# Altium PCB BOARD_4LAYER.PcbDoc (part 10 of 21)
Units mil, origin at the board's own origin, x right, y up, seen from the top; angles counter-clockwise.
Board outline 6692.91 x 10039.37 mil, 4 copper layers (Top Layer, Mid Layer 1, Mid Layer 2, Bottom Layer), stack 66.299 mil thick; 1532 components, 908 nets, 4105 pads, 1286 vias.
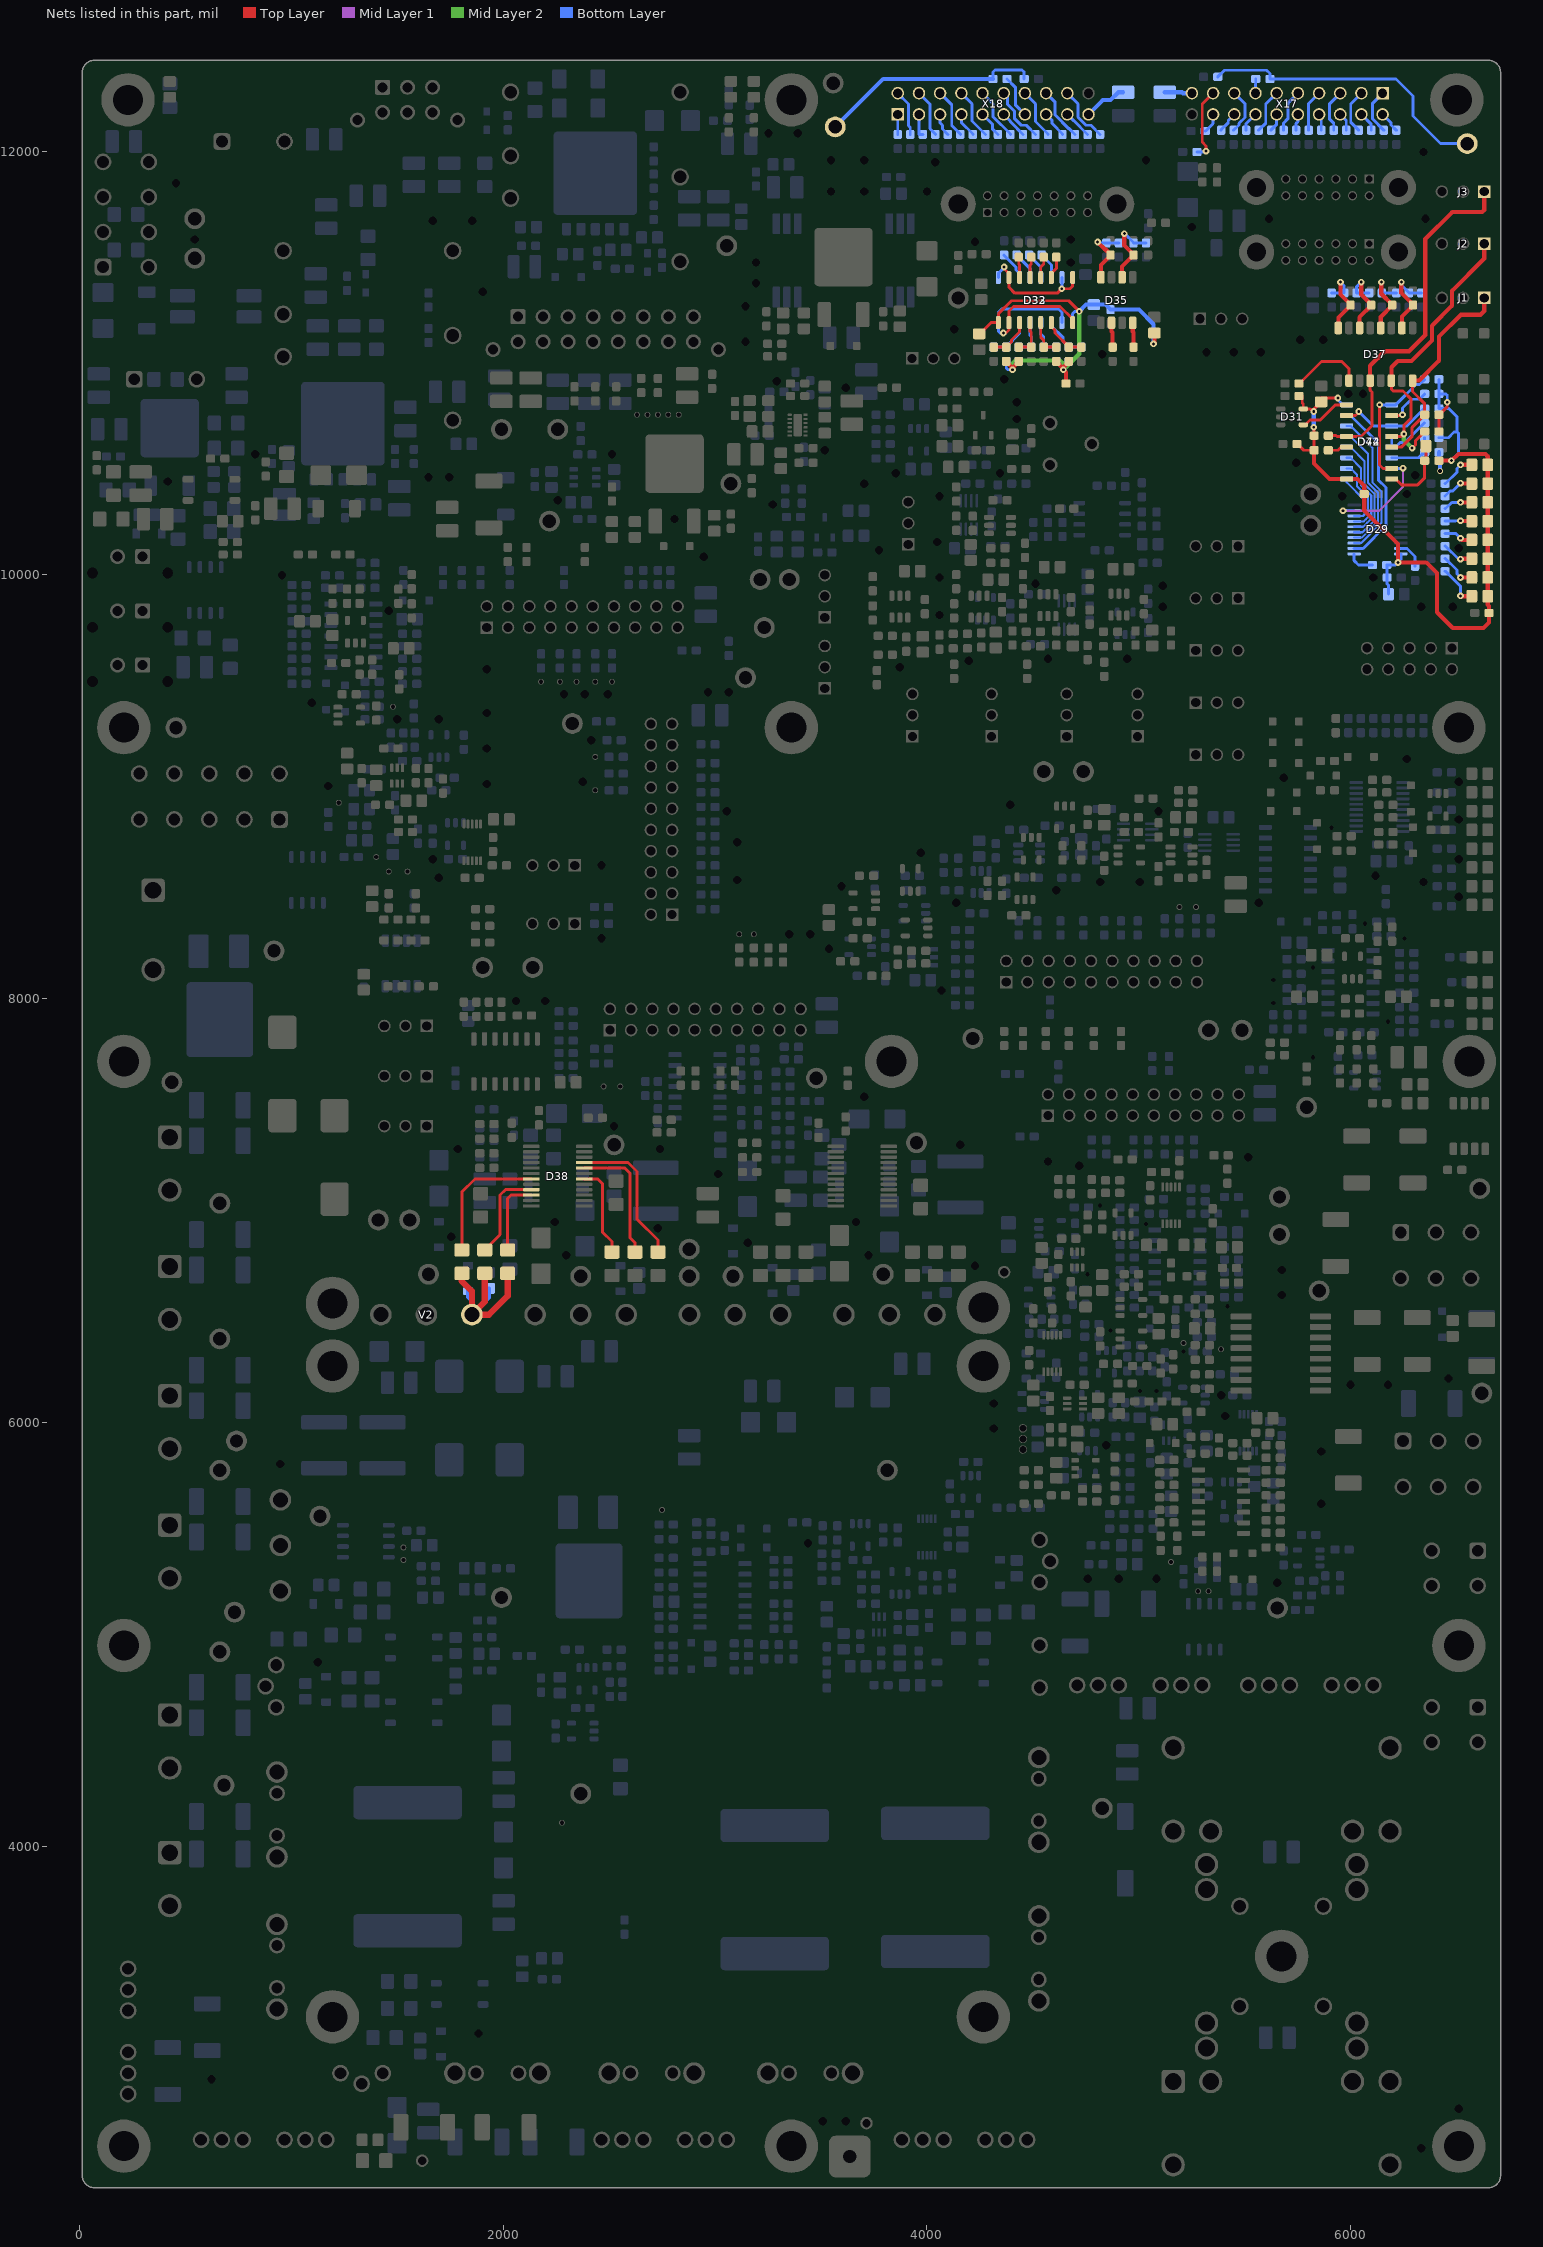
[diagram p12: the nets of this part, all layers, seen from the top]

## Components (designator, comment, footprint, x,y, rotation, side; value= is the part's Value field where it differs from the comment) (continued)
X28 "SBH11-PBPC-D05-ST-BK" IDS-10-V-2,54 6476.77,9655.12 r180 top
X29 "0430451612" 2Rx16K_VERT_Micro 2484.25,11159.45 r180 top locked
X30 "0430450612" 2Rx6K_VERT_Micro 1549.21,12242.13 r180 top

## Footprints (in the part's own frame and the unit in brackets; to place one, negate y for a bottom-side part, rotate by r counter-clockwise, add the part's x,y. Pads: shape width x height; smd on the part's side, far side on the other; paste and mask are expansions set on the pad)
1Rx2K_VERT_Micro [mm]
  rrect22% 1.8x1.8 / inner rrect21% 1.9x1.9 / far side rrect21% 1.8x1.8 hole 1.2 paste-2539.97 mask+0.1: 1(1.5,0)
  round 1.8 / inner round 1.9 / far side round 1.8 hole 1.2 paste-2539.97 mask+0.1: 2(-1.5,0)
  round 0 hole 1.3 unplated paste-2539.97 mask+0: ""(-4.5,-1.96) ""(4.5,-1.96)
  silkscreen extent -4.85,-2.2 4.85,3.7, body extent -4.85,-2.2 4.85,2.2, height 0.03
2-SMD_J-Lead [mm]
  rrect19% 3.2x2 smd paste-0.05 mask+0.1: 1(-4,0) 2(4,0)
  silkscreen extent -4.5,-1.6 4.5,1.6, body extent -4.5,-1.6 4.5,1.6, height 0.03
2Rx4K [mm]
  rrect39% 2x2 hole 1.4 paste-2539.97 mask+0.1: 1(-2.1,2.75)
  round 2 hole 1.4 paste-2539.97 mask+0.1: 2(2.1,2.75) 3(-2.1,-2.75) 4(2.1,-2.75)
  silkscreen extent -5,-6.25 5,4.9, body extent -5,-4.9 5,4.9, height 0.03
2Rx6K [mm]
  rrect39% 2x2 hole 1.4 paste-2539.97 mask+0.1: 1(-4.2,2.75)
  round 2 hole 1.4 paste-2539.97 mask+0.1: 2(0,2.75) 3(4.2,2.75) 4(-4.2,-2.75) 5(0,-2.75) 6(4.2,-2.75)
  silkscreen extent -7.1,-6.25 7.1,4.9, body extent -7.1,-4.9 7.1,4.9, height 0.03
2Rx6K_VERT_Micro [mm]
  rrect22% 1.8x1.8 / inner rrect21% 1.9x1.9 / far side rrect21% 1.8x1.8 hole 1.2 paste-2539.97 mask+0.1: 1(3,-1.5)
  round 1.8 / inner round 1.9 / far side round 1.8 hole 1.2 paste-2539.97 mask+0.1: 2(0,-1.5) 3(-3,-1.5) 4(3,1.5) 5(0,1.5) 6(-3,1.5)
  round 1.8 hole 1.2 paste-2539.97 mask+0.1: ""(-6,2.44) ""(6,2.44)
  silkscreen extent -6.35,-3.7 6.35,5.2, body extent -6.35,-3.7 6.35,3.7, height 0.03
2Rx8K [mm]
  rrect39% 2x2 hole 1.4 paste-2539.97 mask+0.1: 1(-6.3,2.75)
  round 2 hole 1.4 paste-2539.97 mask+0.1: 2(-2.1,2.75) 3(2.1,2.75) 4(6.3,2.75) 5(-6.3,-2.75) 6(-2.1,-2.75) 7(2.1,-2.75) 8(6.3,-2.75)
  silkscreen extent -9.2,-6.25 9.2,4.9, body extent -9.2,-4.9 9.2,4.9, height 0.03
2Rx10K [mm]
  rrect39% 2x2 hole 1.4 paste-2539.97 mask+0.1: 1(-8.4,2.75)
  round 2 hole 1.4 paste-2539.97 mask+0.1: 2(-4.2,2.75) 3(0,2.75) 4(4.2,2.75) 5(8.4,2.75) 6(-8.4,-2.75) 7(-4.2,-2.75) 8(0,-2.75) 9(4.2,-2.75) 10(8.4,-2.75)
  silkscreen extent -11.3,-6.25 11.3,4.9, body extent -11.3,-4.9 11.3,4.9, height 0.03
2Rx16K_VERT_Micro [mm]
  rrect22% 1.8x1.8 / inner rrect21% 1.9x1.9 / far side rrect21% 1.8x1.8 hole 1.2 paste-2539.97 mask+0.1: 1(10.5,-1.5)
  round 1.8 / inner round 1.9 / far side round 1.8 hole 1.2 paste-2539.97 mask+0.1: 2(7.5,-1.5) 3(4.5,-1.5) 4(1.5,-1.5) 5(-1.5,-1.5) 6(-4.5,-1.5) 7(-7.5,-1.5) 8(-10.5,-1.5) 9(10.5,1.5) 10(7.5,1.5) 11(4.5,1.5) 12(1.5,1.5) 13(-1.5,1.5) 14(-4.5,1.5) 15(-7.5,1.5) 16(-10.5,1.5)
  round 1.8 hole 1.2 paste-2539.97 mask+0.1: ""(-13.5,2.44) ""(13.5,2.44)
  silkscreen extent -13.85,-3.7 13.85,5.2, body extent -13.85,-3.7 13.85,3.7, height 0.03
3-1437664-0 [mm]
  rrect28% 2.8x2.8 / inner rrect25% 3.1x3.1 / far side rrect25% 2.8x2.8 hole 2 paste-2539.97 mask+0.15: 1(-4.755,0)
  round 2.8 / inner round 3.1 / far side round 2.8 hole 2 paste-2539.97 mask+0.15: 2(4.755,0)
  silkscreen extent -10.5,-8 10.5,8, body extent -10.5,-8 10.5,8, height 0.03
8-SOIC-VISHAY [mm]
  rrect44% 0.9x1.5 smd paste-0.05 mask+0.1: 1(-1.905,-2.73) 2(-0.635,-2.73) 3(0.635,-2.73) 4(1.905,-2.73) 5(1.905,2.73) 6(0.635,2.73) 7(-0.635,2.73) 8(-1.905,2.73)
  silkscreen extent -3.76,-3.46 3.1,2.1, body extent -3.1,-2.1 3.1,2.1, height 0.03
"12-WFDFN_3mmx2mm_Exposed Pad" [mm]
  rrect40% 0.25x0.5 smd paste-0.025 mask+0.05: 1(-1.25,-0.95) 2(-0.75,-0.95) 3(-0.25,-0.95) 4(0.25,-0.95) 5(0.75,-0.95) 6(1.25,-0.95) 7(1.25,0.95) 8(0.75,0.95) 9(0.25,0.95) 10(-0.25,0.95) 11(-0.75,0.95) 12(-1.25,0.95)
  rrect20% 2.65x1 smd paste-0.05 mask+0.05: 13(0,0)
  silkscreen extent -1.75,-1.45 1.55,1.05, body extent -1.55,-1.05 1.55,1.05, height 0.03
14_h12_7_2K-PICH6_35 [mm]
  rrect28% 2.8x2.8 / inner rrect25% 3.1x3.1 / far side rrect25% 2.8x2.8 hole 2 paste-2539.97 mask+0.15: 1(-3.175,0)
  round 2.8 / inner round 3.1 / far side round 2.8 hole 2 paste-2539.97 mask+0.15: 2(3.175,0)
  silkscreen extent -7.25,-10.2 7.25,3.8, body extent -7.25,-10.2 7.25,3.8, height 0.03
16-SOIC-7mm5W-Allegro [mm]
  rrect28% 0.7x2.5 smd paste-0.05 mask+0.1: 1(-4.445,-4.75) 2(-3.175,-4.75) 3(-1.905,-4.75) 4(-0.635,-4.75) 5(0.635,-4.75) 6(1.905,-4.75) 7(3.175,-4.75) 8(4.445,-4.75) 9(4.445,4.75) 10(3.175,4.75) 11(1.905,4.75) 12(0.635,4.75) 13(-0.635,4.75) 14(-1.905,4.75) 15(-3.175,4.75) 16(-4.445,4.75)
  silkscreen extent -5.61,-7.31 5.25,3.8, body extent -5.25,-3.8 5.25,3.8, height 0.03
16-SOIC-VISHAY [mm]
  rrect44% 0.9x1.5 smd paste-0.05 mask+0.1: 1(-4.445,-3.15) 2(-3.175,-3.15) 3(-1.905,-3.15) 4(-0.635,-3.15) 5(0.635,-3.15) 6(1.905,-3.15) 7(3.175,-3.15) 8(4.445,-3.15) 9(4.445,3.15) 10(3.175,3.15) 11(1.905,3.15) 12(0.635,3.15) 13(-0.635,3.15) 14(-1.905,3.15) 15(-3.175,3.15) 16(-4.445,3.15)
  silkscreen extent -6.25,-3.75 5.2,2.3, body extent -5.2,-2.3 5.2,2.3, height 0.03
0603-STANDART-1608 [mm]
  rrect40% 1.1x1 smd paste-0.05 mask+0.1: 1(-0.85,0) 2(0.85,0)
  silkscreen extent -0.85,-0.47 0.85,0.48, body extent -0.85,-0.47 0.85,0.48, height 0.03
0805-STANDART-2012 [mm]
  rrect30% 1.3x1.5 smd paste-0.05 mask+0.1: 1(-0.95,0) 2(0.95,0)
  silkscreen extent -1.08,-0.7 1.07,0.7, body extent -1.08,-0.7 1.07,0.7, height 0.03
0805-STANDART-2012-SVET [mm]
  rrect30% 1.3x1.5 smd paste-0.05 mask+0.1: 1(-0.95,0) 2(0.95,0)
  silkscreen extent -1.08,-0.75 2,0.75, body extent -1.08,-0.7 1.07,0.7, height 0.03
1206-STANDART-3216 [mm]
  rrect25% 1.6x1.8 smd paste-0.05 mask+0.1: 1(-1.4,0) 2(1.4,0)
  silkscreen extent -1.68,-0.88 1.67,0.87, body extent -1.68,-0.88 1.67,0.87, height 0.03
1210-STANDART-3225 [mm]
  rrect25% 1.6x2.7 smd paste-0.05 mask+0.1: 1(-1.4,0) 2(1.4,0)
  silkscreen extent -1.68,-1.32 1.67,1.32, body extent -1.68,-1.32 1.67,1.32, height 0.03
1770TA_SERIES_16t9x16t9_H7 [mm]
  rrect24% 4x13 smd paste-0.1 mask+0.1: 1(-7.675,0) 2(7.675,0)
  silkscreen extent -8.55,-8.55 8.55,8.55, body extent -8.55,-8.55 8.55,8.55, height 0.03
1808-STANDART-4520 [mm]
  rrect22% 1.75x2.3 smd paste-0.1 mask+0.1: 1(-2.3,0) 2(2.3,0)
  silkscreen extent -2.6,-1.1 2.6,1.1, body extent -2.6,-1.1 2.6,1.1, height 0.03
2220STANDART5650 [mm]
  rrect23% 1.7x5.5 smd paste-0.05 mask+0.1: 1(-2.75,0) 2(2.75,0)
  silkscreen extent -3.05,-2.7 3.05,2.7, body extent -3.05,-2.7 3.05,2.7, height 0.03
2512-STANDART-6332 [mm]
  rrect22% 1.8x3.2 smd paste-0.05 mask+0.1: 1(-2.8,0) 2(2.8,0)
  silkscreen extent -3.23,-1.7 3.22,1.7, body extent -3.23,-1.7 3.22,1.7, height 0.03
3306-F-BOURNS [mm]
  round 1.8 / inner round 1.9 / far side round 1.8 hole 1.2 paste-2539.97 mask+0.1: 1(-2.5,0) 2(0,5) 3(2.5,0)
  silkscreen extent -3.65,0 3.65,8.7, body extent -3.65,0 3.65,8.7, height 0.03
7914G [mm]
  rrect31% 1.27x1.27 smd paste-0.05 mask+0.1: 1(-2.75,-1.27) 2(2.75,-1.27) 3(2.75,1.27) 4(-2.75,1.27)
  silkscreen extent -2.25,-2.5 2.25,2.5, body extent -2.25,-2.5 2.25,2.5, height 0.03
CAP-EL-L7.5-D18,0 [mm]
  rrect39% 2x2 hole 1.4 paste-2539.97 mask+0.1: 1(-3.75,0)
  round 2 hole 1.4 paste-2539.97 mask+0.1: 2(3.75,0)
  silkscreen extent -9.25,-9.25 9.25,9.25, body extent -9.25,-9.25 9.25,9.25, height 0.03
CAP_PP_L15mm_UNIVER_V1 [mm]
  round 2 hole 1.4 paste-2539.97 mask+0.1: 1(-7.5,0) 2(7.5,0) ""(-5,0) ""(-2.5,0) ""(2.5,0) ""(5,0)
  silkscreen extent -10,-5 10,5, body extent -10,-5 10,5, height 0.03
CONT_OSC [mm]
  round 0.7 hole 0.5 paste-2539.97 mask+0.05: 1(0,0)
  silkscreen extent -0.5,-0.5 0.5,0.5, body extent -0.36,-0.36 0.36,0.36, height 0.03
CPC1017-IXYS [mm]
  rrect50% 0.8x1.3 smd paste-0.05 mask+0.1: 1(-1.27,-2.8) 2(1.27,-2.8) 3(1.27,2.8) 4(-1.27,2.8)
  silkscreen extent -3.31,-3.06 2.15,1.95, body extent -2.15,-1.95 2.15,1.95, height 0.03
D_R_PDSO-G16 [mm]
  rrect33% 0.6x1.55 smd paste-0.05 mask+0.1: 1(-4.445,-2.7) 2(-3.175,-2.7) 3(-1.905,-2.7) 4(-0.635,-2.7) 5(0.635,-2.7) 6(1.905,-2.7) 7(3.175,-2.7) 8(4.445,-2.7) 9(4.445,2.7) 10(3.175,2.7) 11(1.905,2.7) 12(0.635,2.7) 13(-0.635,2.7) 14(-1.905,2.7) 15(-3.175,2.7) 16(-4.445,2.7)
  silkscreen extent -5.15,-4.7 5,2, body extent -5,-2 5,2, height 0.03
D_R_PDSO_G14 [mm]
  rrect33% 0.6x1.55 smd paste-0.05 mask+0.1: 1(-3.81,-2.7) 2(-2.54,-2.7) 3(-1.27,-2.7) 4(0,-2.7) 5(1.27,-2.7) 6(2.54,-2.7) 7(3.81,-2.7) 8(3.81,2.7) 9(2.54,2.7) 10(1.27,2.7) 11(0,2.7) 12(-1.27,2.7) 13(-2.54,2.7) 14(-3.81,2.7)
  silkscreen extent -6.41,-3.31 4.38,2, body extent -4.38,-2 4.38,2, height 0.03
DBV_R-PDSO-G6 [mm]
  rrect36% 0.55x1 smd paste-0.05 mask+0.05: 1(-0.95,-1.35) 2(0,-1.35) 3(0.95,-1.35) 4(0.95,1.35) 5(0,1.35) 6(-0.95,1.35)
  silkscreen extent -2,-1.5 1.53,0.87, body extent -1.52,-0.87 1.53,0.87, height 0.03
DCT_R_PDSO_G8_TI_SM8 [mm]
  rrect66% 0.3x1.6 smd paste-2539.97 mask+0.075: 1(-0.975,-1.7) 2(-0.325,-1.7) 3(0.325,-1.7) 4(0.975,-1.7) 5(0.975,1.7) 6(0.325,1.7) 7(-0.325,1.7) 8(-0.975,1.7)
  silkscreen extent -2,-2.56 1.58,1.45, body extent -1.57,-1.45 1.58,1.45, height 0.03
DPAK-3-TO252-ONSEMI [mm]
  rrect25% 1.6x3 smd paste-0.05 mask+0.1: 1(-2.3,0) 3(2.3,0)
  rrect14% 7x7 smd paste-0.1 mask+0.1: 4(0,6.9)
  silkscreen extent -3.75,3 3.75,10.75, body extent -3.35,2.85 3.35,9.05, height 0.03
DPAK-PWR163-BOURNS [mm]
  rrect16% 2.4x4 smd paste-0.05 mask+0.1: 1(-2.54,0) 2(2.3,0)
  rrect12% 8x9 smd paste-0.1 mask+0.1: 3(0,8.2)
  silkscreen extent -4.1,3.1 4.1,10.5, body extent -4.1,3.1 4.1,11.3, height 0.03
DPAK-TO252-DIODES-IR [mm]
  rrect26% 1.5x2.5 smd paste-0.05 mask+0.1: 1(-2.3,0) 3(2.3,0)
  rrect14% 7x7 smd paste-0.1 mask+0.1: 4(0,6.9)
  silkscreen extent -3.75,3 3.75,10.75, body extent -3.35,2.85 3.35,9.05, height 0.03
DVB-R-PDSO-G12/G28 [mm]
  rrect22% 0.9x2.5 smd paste-0.05 mask+0.1: 1(-8.04,-4.4) 2(-6.78,-4.4) 3(-5.5,-4.4) 12(5.5,-4.4) 13(6.78,-4.4) 14(8.04,-4.4) 15(8.04,4.4) 16(6.78,4.4) 17(5.5,4.4) 26(-5.5,4.4) 27(-6.78,4.4) 28(-8.04,4.4)
  silkscreen extent -10.65,-6.15 9.05,3.8, body extent -9.05,-3.8 9.05,3.8, height 0.03
HRP-5 [mm]
  rrect36% 1.1x1.5 smd paste-0.05 mask+0.1: 1(-3.44,0) 2(-1.72,0) 3(0,0) 4(1.72,0) 5(3.44,0)
  rrect9% 10x10 smd paste-0.1 mask+0.1: 6(0,6.69)
  silkscreen extent -5.5,0 5.5,12.25, body extent -5.5,0 5.5,12.25, height 0.03
IDS-10-V-2,54 [mm]
  rrect0% 1.5x1.5 hole 1.1 paste-2539.97 mask+0.1: 1(0,0)
  round 1.5 hole 1.1 paste-2539.97 mask+0.1: 2(0,2.54) 3(2.54,0) 4(2.54,2.54) 5(5.08,0) 6(5.08,2.54) 7(7.62,0) 8(7.62,2.54) 9(10.16,0) 10(10.16,2.54)
  silkscreen extent -5.17,-3.38 15.33,5.92, body extent -5.17,-3.38 15.33,5.92, height 0.03
IDS-20-V-2,54 [mm]
  rrect0% 1.5x1.5 hole 1.1 paste-2539.97 mask+0.1: 1(0,0)
  round 1.5 hole 1.1 paste-2539.97 mask+0.1: 2(0,2.54) 3(2.54,0) 4(2.54,2.54) 5(5.08,0) 6(5.08,2.54) 7(7.62,0) 8(7.62,2.54) 9(10.16,0) 10(10.16,2.54) 11(12.7,0) 12(12.7,2.54) 13(15.24,0) 14(15.24,2.54) 15(17.78,0) 16(17.78,2.54) 17(20.32,0) 18(20.32,2.54) 19(22.86,0) 20(22.86,2.54)
  silkscreen extent -5.17,-3.38 28.03,5.92, body extent -5.17,-3.38 28.03,5.92, height 0.03
M80-VERT-J-TEK-12 [mm]
  rrect0% 1.1x1.1 hole 0.8 paste-2539.97 mask+0.1: 1(5,1)
  round 1.1 hole 0.8 paste-2539.97 mask+0.05: 2(3,1) 3(1,1) 4(-1,1) 5(-3,1) 6(-5,1) 7(5,-1) 8(3,-1) 9(1,-1) 10(-1,-1) 11(-3,-1) 12(-5,-1)
  round 4.2 / inner round 4.4 / far side round 4.2 hole 2.3 paste-2539.97 mask-2.1: ""(-8.5,0) ""(8.5,0)
  silkscreen extent -11,-3.05 11,3.05, body extent -11,-3.05 11,3.05, height 0.03
M80-VERT-J-TEK-14 [mm]
  rrect0% 1.1x1.1 hole 0.8 paste-2539.97 mask+0.1: 1(6,1)
  round 1.1 hole 0.8 paste-2539.97 mask+0.05: 2(4,1) 3(2,1) 4(0,1) 5(-2,1) 6(-4,1) 7(-6,1) 8(6,-1) 9(4,-1) 10(2,-1) 11(0,-1) 12(-2,-1) 13(-4,-1) 14(-6,-1)
  round 4.2 / inner round 4.4 / far side round 4.2 hole 2.3 paste-2539.97 mask-2.1: ""(-9.5,0) ""(9.5,0)
  silkscreen extent -12,-3.05 12,3.05, body extent -12,-3.05 12,3.05, height 0.03
MGSHV-0_2-D1_6xd0_62 [mm]
  round 1.5 hole 1 paste-2539.97 mask+0.05: 1(0,0)
  silkscreen extent -1,-1 1,1, body extent -1,-1 1,1, height 0.03
MSOP-RM-10-AD#1 [mm]
  rrect58% 0.34x1.04 smd paste+0 mask-2539.97: 1(-1,-2.2) 2(-0.5,-2.2) 3(0,-2.2) 4(0.5,-2.2) 5(1,-2.2) 6(1,2.2) 7(0.5,2.2) 8(0,2.2) 9(-0.5,2.2) 10(-1,2.2)
  silkscreen extent -2.12,-2.38 1.5,1.5, body extent -1.5,-1.5 1.5,1.5, height 0.03
MSOP-RM-10-AD#2 [mm]
  rrect58% 0.34x1.04 smd paste-0.05 mask-0.52: 1(-1,-2.2) 2(-0.5,-2.2) 3(0,-2.2) 4(0.5,-2.2) 5(1,-2.2) 6(1,2.2) 7(0.5,2.2) 8(0,2.2) 9(-0.5,2.2) 10(-1,2.2)
  silkscreen extent -2.12,-2.38 1.5,1.5, body extent -1.5,-1.5 1.5,1.5, height 0.03
PLS-3-2,54 [mm]
  rrect0% 1.5x1.5 hole 1.1 paste-2539.97 mask+0.1: 1(-2.54,0)
  round 1.5 hole 1.1 paste-2539.97 mask+0.1: 2(0,0) 3(2.54,0)
  silkscreen extent -3.8,-2.5 3.8,2.5, body extent -3.8,-2.5 3.8,2.5, height 0.03
PW-R-PDSO-G20 [mm]
  rrect57% 0.35x1.6 smd paste-0.05 mask+0.075: 1(-2.925,-2.8) 2(-2.275,-2.8) 3(-1.625,-2.8) 4(-0.975,-2.8) 5(-0.325,-2.8) 6(0.325,-2.8) 7(0.975,-2.8) 8(1.625,-2.8) 9(2.275,-2.8) 10(2.925,-2.8) 11(2.925,2.8) 12(2.275,2.8) 13(1.625,2.8) 14(0.975,2.8) 15(0.325,2.8) 16(-0.325,2.8) 17(-0.975,2.8) 18(-1.625,2.8) 19(-2.275,2.8) 20(-2.925,2.8)
  silkscreen extent -4.1,-3.35 3.3,2.25, body extent -3.3,-2.25 3.3,2.25, height 0.03
RTVSxP1UP [mm]
  rrect28% 1.4x2.1 smd paste-0.1 mask+0.1: 1(-2.2,0) 2(2.2,0)
  silkscreen extent -3.5,-1.35 2,1.35, body extent -2,-1.35 2,1.35, height 0.03
SC-70-KS-6-AD [mm]
  rrect50% 0.4x1 smd paste-0.05 mask+0.05: 1(-0.65,-0.95) 2(0,-0.95) 3(0.65,-0.95) 4(0.65,0.95) 5(0,0.95) 6(-0.65,0.95)
  silkscreen extent -1.5,-1.5 1.1,0.7, body extent -1.1,-0.7 1.1,0.7, height 0.03
SC-J_SC-JH_WE-SMB_UNIVER [mm]
  rrect28% 2.8x2.8 / inner rrect25% 3.1x3.1 / far side rrect25% 2.8x2.8 hole 2 paste-2539.97 mask+0.15: 1(-15,13)
  round 2.8 / inner round 3.1 / far side round 2.8 hole 2 paste-2539.97 mask+0.15: 2(-15,-13) 3(15,-13) 4(15,13)
  round 2.8 hole 2 paste-2539.97 mask+0.1: ""(-25,-13) ""(-25,13) ""(-15,-8.5) ""(-15,8.5) ""(-11,-9) ""(-11,9) ""(-8,-9) ""(-8,9) ""(8,-9) ""(8,9) ""(11,-9) ""(11,9) ""(15,-8.5) ""(15,8.5) ""(25,-13) ""(25,13)
  round 2.1 hole 1.5 paste-2539.97 mask+0.1: ""(-6,-5) ""(-6,5) ""(6,-5) ""(6,5)
  round 6.4 hole 3.6 paste-2539.97 mask-3.2: ""(0,0)
  silkscreen extent -25.5,-25.5 25.5,25.5, body extent -25.5,-25.5 25.5,25.5, height 0.03
SMB-DIODES_1 [mm]
  rrect17% 2.3x2.5 smd paste-0.05 mask+0.1: 1(-2.15,0) 2(2.15,0)
  silkscreen extent -3.75,-2 2.3,2, body extent -2.3,-2 2.3,2, height 0.03
SMB-MURS140-MURS160-DIODES [mm]
  rrect17% 2.5x2.3 smd paste-0.05 mask+0.1: 1(-2.15,0) 2(2.15,0)
  silkscreen extent -3.8,-2 2.25,2, body extent -2.25,-2 2.25,2, height 0.03
SMB-ST [mm]
  rrect17% 2.3x2.5 smd paste-0.05 mask+0.1: 1(-2.15,0) 2(2.15,0)
  silkscreen extent -3.75,-2 2.3,2, body extent -2.3,-2 2.3,2, height 0.03
SMW-SMF-3W [mm]
  rrect23% 4x3.4 smd paste-0.05 mask+0.1: 1(-5,0) 2(5,0)
  silkscreen extent -5.4,-2.9 5.4,2.9, body extent -5.4,-2.9 5.4,2.9, height 0.03
SOD123-DIODES [mm]
  rrect22% 0.9x0.95 smd paste-0.05 mask+0.05: 1(-1.575,0) 2(1.575,0)
  silkscreen extent -1.45,-0.85 1.45,0.85, body extent -1.45,-0.85 1.45,0.85, height 0.03
SOD323F_SC90 [mm]
  rrect25% 1x0.8 smd paste-0.05 mask+0.1: 1(-1.1,0) 2(1.1,0)
  silkscreen extent -2,-0.7 0.9,0.7, body extent -0.9,-0.7 0.9,0.7, height 0.03
SOD-123FL [mm]
  rrect22% 0.9x1.2 smd paste-0.05 mask+0.1: 1(-1.525,0) 2(1.525,0)
  silkscreen extent -2.35,-0.8 1.3,0.8, body extent -1.3,-0.8 1.3,0.8, height 0.03
SOIC-8-AD-R8 [mm]
  rrect72% 0.55x1.43 smd paste-0.05 mask+0.1: 1(-1.92,-2.75) 2(-0.64,-2.75) 3(0.64,-2.75) 4(1.92,-2.75) 5(1.92,2.75) 6(0.64,2.75) 7(-0.64,2.75) 8(-1.92,2.75)
  silkscreen extent -3.35,-3.11 2.5,2, body extent -2.5,-2 2.5,2, height 0.03
SOIC-16-SIL-LAB-NB [mm]
  rrect66% 0.6x1.55 smd paste-0.05 mask+0.1: 1(-4.445,-2.7) 2(-3.175,-2.7) 3(-1.905,-2.7) 4(-0.635,-2.7) 5(0.635,-2.7) 6(1.905,-2.7) 7(3.175,-2.7) 8(4.445,-2.7) 9(4.45,2.7) 10(3.175,2.7) 11(1.905,2.7) 12(0.635,2.7) 13(-0.635,2.7) 14(-1.905,2.7) 15(-3.175,2.7) 16(-4.445,2.7)
  silkscreen extent -5.95,-3.55 5,2, body extent -5,-2 5,2, height 0.03
SOT23-6-LT [mm]
  rrect64% 0.62x1.22 smd paste-0.05 mask+0.07: 1(-0.95,-1.31) 2(0,-1.31) 3(0.95,-1.31) 4(0.95,1.31) 5(0,1.31) 6(-0.95,1.31)
  silkscreen extent -2.15,-1.91 1.55,0.9, body extent -1.55,-0.9 1.55,0.9, height 0.03
SOT-23-DBV-R-PDSO-G5-TI [mm]
  rrect66% 0.6x1.1 smd paste-0.05 mask+0.1: 1(-0.95,-1.35) 2(0,-1.35) 3(0.95,-1.35) 4(0.95,1.35) 5(-0.95,1.35)
  silkscreen extent -1.55,-0.9 1.55,0.9, body extent -1.55,-0.9 1.55,0.9, height 0.03
SOT-23-RT-3-AD [mm]
  rrect36% 0.55x1 smd paste-0.05 mask+0.05: 1(-0.95,-1.2) 2(0.95,-1.2) 3(0,1.2)
  silkscreen extent -1.5,-0.7 1.5,0.7, body extent -1.5,-0.7 1.5,0.7, height 0.03
SR0905 [mm]
  rrect25% 3x1.6 smd paste-0.05 mask+0.1: 1(-4,1.27) 2(-4,-1.27) 3(4,-1.27) 4(4,1.27)
  silkscreen extent -5.56,-3.15 4.75,4.56, body extent -4.75,-3.15 4.75,3.15, height 0.03
SSOP-24-IR [mm]
  rrect52% 0.38x2 smd paste-0.05 mask+0.06: 1(-3.575,-3.175) 2(-2.925,-3.175) 3(-2.275,-3.175) 4(-1.625,-3.175) 5(-0.975,-3.175) 6(-0.325,-3.175) 7(0.325,-3.175) 8(0.975,-3.175) 9(1.625,-3.175) 10(2.275,-3.175) 11(2.925,-3.175) 12(3.575,-3.175) 13(3.575,3.175) 14(2.925,3.175) 15(2.275,3.175) 16(1.625,3.175) 17(0.975,3.175) 18(0.325,3.175) 19(-0.325,3.175) 20(-0.975,3.175) 21(-1.625,3.175) 22(-2.275,3.175) 23(-2.925,3.175) 24(-3.575,3.175)
  silkscreen extent -5.26,-4.31 4.25,2.8, body extent -4.25,-2.8 4.25,2.8, height 0.03
TAJ-B [mm]
  rrect28% 1.4x2.8 smd paste-0.05 mask+0.1: 1(-1.3,0) 2(1.3,0)
  silkscreen extent -2.25,-1.5 1.85,1.5, body extent -1.85,-1.5 1.85,1.5, height 0.03
TERMINAL-1 [mm]
  rrect32% 5x5 hole 1.6 paste-0.05 mask+0.1: 1(0,0)
  silkscreen extent -2,-2 2,2, body extent -2,-2 2,2, height 0.03
TEST-POINTS-1 [mm]
  round 2.5 hole 1.6 paste-2539.97 mask+0.05: 1(0,0)
  silkscreen extent -1.6,-1.6 1.6,1.6, body extent -1.6,-1.6 1.6,1.6, height 0.03
THN-30 [mm]
  round 2.1 hole 1.5 paste-2539.97 mask+0.05: 1(-10.16,-2.54) 2(-10.16,2.54) 3(10.16,-10.16) 4(10.16,0) 5(10.16,10.16) 6(-10.16,10.16)
  silkscreen extent -13,-13 13,13, body extent -13,-13 13,13, height 0.03
TO-92_3_T-3-1_AD [mm]
  round 1 hole 0.8 paste-2539.97 mask+0.05: 1(-1.27,0) 2(0,0) 3(1.27,0)
  silkscreen extent -2.41,-1.3 2.41,2.41, body extent -2.42,-1.3 2.42,2.41, height 0.03
TO-220-2_C1_A2_DIODE [mm]
  round 2 hole 1.4 paste-2539.97 mask+0.1: 1(-2.54,0) 2(2.54,0)
  silkscreen extent -5.2,-1.25 5.2,3.25, body extent -4,-1.25 4,1.15, height 0.03
TO-220AB_V_IR [mm]
  round 2 hole 1.4 paste-2539.97 mask+0.1: 1(-2.54,0) 2(0,-1.27) 3(2.54,0)
  silkscreen extent -5.2,-1.25 5.2,3.25, body extent -4,-1.25 4,1.15, height 0.03
TO-247AC-d1_8 [mm]
  round 2.6 / inner round 2.8 / far side round 2.6 hole 1.8 paste-2539.97 mask+0.1: 1(-5.46,0) 2(0,0) 3(5.46,0)
  silkscreen extent -8,-2.65 8,2.65, body extent -8,-2.65 8,2.65, height 0.03
TO-247AC-d1_8_R_UNIVER [mm]
  round 2.6 / inner round 2.8 / far side round 2.6 hole 1.8 paste-2539.97 mask+0.1: 1(-5.08,0) 2(5.08,0)
  round 1.9 hole 1.3 paste-2539.97 mask+0.1: ""(-2.54,0) ""(2.54,0)
  silkscreen extent -8,-3.15 8,2.15, body extent -6.5,-1.5 6.5,1.5, height 0.03
TSOT-5-UJ-5-AD [mm]
  rrect36% 0.55x0.9 smd paste-0.05 mask+0.05: 1(-0.95,-1.25) 2(0,-1.25) 3(0.95,-1.25) 4(0.95,1.25) 5(-0.95,1.25)
  silkscreen extent -1.45,-0.8 1.45,0.8, body extent -1.45,-0.8 1.45,0.8, height 0.03

## Free pads (board coordinates)
  round 251.97 hole 141.73 paste-99999 mask-125.98: ""(210.63,2586.61) ""(210.63,4948.82) ""(210.63,7704.72) ""(210.63,9279.53) ""(230.31,12242.13) ""(1194.88,3196.85) ""(1194.88,6267.72) ""(1194.88,6562.99) ""(3360.24,2586.61) ""(3360.24,9279.53) ""(3360.24,12242.13) ""(3832.68,7704.72) ""(4265.75,3196.85) ""(4265.75,6267.72) ""(4265.75,6543.31) ""(6500,12242.13) ""(6509.84,2586.61) ""(6509.84,4948.82) ""(6509.84,9279.53) ""(6559.06,7704.72)
  round 0 hole 39.37 unplated paste-99999 mask+0: ""(417.32,10440.94) ""(456.69,11848.43) ""(545.28,11582.68) ""(624.02,2901.57) ""(830.71,10568.9) ""(948.82,5805.12) ""(956.69,9998.03) ""(1096.46,9397.64) ""(1125.98,4870.08) ""(1175.2,9003.94) ""(1460.63,9830.71) ""(1500,9318.9) ""(1647.64,10460.63) ""(1667.32,8659.45) ""(1667.32,11671.26) ""(1696.85,8570.87) ""(1696.85,9318.9) ""(1746.06,10460.63) ""(1755.91,6877.95) ""(1785.43,7291.34) ""(1854.33,11671.26) ""(1883.86,3118.11) ""(1903.54,11336.61) ""(1923.23,9013.78) ""(1923.23,9181.1) ""(1923.23,9348.43) ""(1923.23,9555.12) ""(2061.02,7990.16) ""(2198.82,7990.16) ""(2244.09,6946.85) ""(2257.87,10352.36) ""(2287.4,9437.01) ""(2297.24,6789.37) ""(2375.98,9023.62) ""(2385.83,9437.01) ""(2415.35,9220.47) ""(2464.57,8285.43) ""(2464.57,8629.92) ""(2494.09,9437.01) ""(2513.78,10568.9) ""(2523.62,7399.61) ""(2730.32,6917.32) ""(2740.16,7291.34) ""(2809.06,10263.78) ""(2946.85,10086.61) ""(2966.54,9446.85) ""(3015.75,7173.23) ""(3055.12,8885.83) ""(3064.96,9446.85) ""(3104.33,8561.02) ""(3104.33,8738.19) ""(3143.7,11100.39) ""(3143.7,11267.72) ""(3153.54,6848.43) ""(3192.91,11375.98) ""(3192.91,11474.41) ""(3251.97,12084.65) ""(3271.65,10332.68) ""(3291.34,10913.39) ""(3350.39,8305.12) ""(3389.76,12084.65) ""(3438.98,5431.1) ""(3448.82,8305.12) ""(3507.87,2704.72) ""(3517.72,10588.58) ""(3537.4,8236.22) ""(3547.24,11809.06) ""(3547.24,11956.69) ""(3596.46,8531.5) ""(3616.14,2704.72) ""(3616.14,10883.86) ""(3665.35,6946.85) ""(3704.72,7537.4) ""(3704.72,10431.1) ""(3704.72,11809.06) ""(3704.72,11956.69) ""(3724.41,6789.37) ""(3773.62,10116.14) ""(3852.36,10480.32) ""(3872.05,9564.96) ""(3970.47,8688.98) ""(4000,11809.06) ""(4039.37,11946.85) ""(4049.21,10155.51) ""(4059.06,9811.02) ""(4059.06,9988.19) ""(4059.06,10372.05) ""(4068.9,8039.37) ""(4127.95,11159.45) ""(4137.8,8452.76) ""(4157.48,7311.02) ""(4196.85,9594.49) ""(4226.38,6740.16) ""(4226.38,11572.83) ""(4314.96,5972.44) ""(4314.96,6090.55) ""(4344.49,10480.32) ""(4364.17,10923.23) ""(4393.7,8915.35) ""(4423.23,10736.22) ""(4423.23,10814.96) ""(4511.81,9958.66) ""(4570.87,7232.28) ""(4570.87,9604.33) ""(4610.24,8511.81) ""(4679.13,11474.41) ""(4679.13,11582.68) ""(4718.5,7212.6) ""(4757.87,5263.78) ""(4816.93,8551.18) ""(4826.77,11041.34) ""(4846.46,5893.7) ""(4905.51,5263.78) ""(4944.88,9604.33) ""(5003.94,8551.18) ""(5033.46,11956.69) ""(5082.68,5263.78) ""(5092.52,8885.83) ""(5112.2,9850.39) ""(5112.2,9948.82) ""(5250,11641.73) ""(5318.9,11051.18) ""(5387.8,6129.92) ""(5407.48,6031.5) ""(5446.85,11051.18) ""(5515.75,7251.97) ""(5564.96,8452.76) ""(5574.8,11051.18) ""(5614.17,11681.1) ""(5653.54,5244.09) ""(5673.23,6602.36) ""(5673.23,6720.47) ""(5683.07,9043.31) ""(5742.13,10312.99) ""(5742.13,10529.53) ""(5761.81,11110.24) ""(5860.24,5618.11) ""(5860.24,5864.17) ""(5870.08,11110.24) ""(5958.66,10372.05) ""(5988.19,10854.33) ""(5998.03,6179.13) ""(6057.09,10854.33) ""(6106.3,9899.61) ""(6106.3,9988.19) ""(6116.14,8580.71) ""(6175.2,6179.13) ""(6263.78,9131.89) ""(6263.78,10381.89) ""(6303.15,10470.47) ""(6332.68,2576.77) ""(6332.68,9850.39) ""(6342.52,8551.18) ""(6342.52,11996.06) ""(6352.36,11681.1) ""(6460.63,6208.66) ""(6480.31,9850.39) ""(6509.84,2763.78) ""(6509.84,8482.28) ""(6509.84,8659.45) ""(6509.84,8846.46) ""(6509.84,9023.62) ""(6509.84,10125.98)
  round 0 hole 19.68 unplated paste-99999 mask+0: ""(4757.87,6700.79) ""(4816.93,7025.59) ""(4866.14,6435.04) ""(5005.91,6149.61) ""(5033.46,6937.01) ""(5082.68,6149.61) ""(5210.63,6336.61) ""(5417.32,6549.21) ""(5633.86,7980.31) ""(5633.86,8088.58) ""(5820.87,7724.41) ""(5820.87,8147.64) ""(5909.45,8807.09) ""(6066.93,8354.33) ""(6175.2,7891.73) ""(6253.94,8285.43)

## Via types
v1: diameter 27.56/31.5/31.5/27.56 (per signal layer), hole 13.78, Top Layer to Bottom Layer, 1270 vias
v2: diameter 59.06, hole 39.37, Top Layer to Bottom Layer, 16 vias

## Nets (pads, with @x,y where several pads share a name; then routed paths per layer and width w, separated by ;. In a path a pad name is that pad's centre, name@x,y a point inside that pad or via, vN(x,y) a via of type N, cw(c..) or ccw(c..) an arc to the next point about the centre after c; other vN are vias at no path point)
$1N2746: C13.2 C14.2 C105.2 C162.1 C199.2 D29.20 D31.5 D42.16 D74.16 FB60.1 H9.1 H10.1 H11.1 H12.1 H13.1 H14.1 H15.1 H16.1 R217.1 R224.1 R225.1 R226.1 R227.1 R228.1 R229.1 R230.1 R231.1 R232.1 R233.1 | length 4140.3
  Top Layer w13.78: FB60.1@5746.06,10618.11 5748.03,10618.11 5777.56,10588.58 R224.1@5826.77,10588.58 R226.1@5826.77,10657.48 5826.77,10694.88 v1(5824.8,10696.85) ; R229.1@5755.91,10844.49 5770.71,10844.49 5770.71,10811.07 5775.59,10806.18 D31.5@5775.59,10783.46 5808.15,10783.46 5810.12,10781.5 v1@5824.8,10781.5 ; v1(5824.8,10771.65) v1@5824.8,10781.5 ; v1(5938.98,10834.65) 5860.24,10834.65 C105.2@5860.24,10816.93 v1@5824.8,10781.5 ; R227.1@6415.35,10677.17 R228.1@6415.35,10755.91 6417.32,10755.91 6454.72,10793.31 v1(6454.72,10814.96)
  Top Layer w19.68: R224.1@5826.77,10588.58 5826.77,10526.24 5900.06,10452.95 D74.16@5980.31,10452.95 6031.97,10452.95 6062.99,10421.93 C14.2@6062.99,10381.89 6062.99,10304.97 6222.16,10145.81 6222.16,10084.02 6222.44,10083.74 v1(6222.44,10059.06) 6356.14,10059.06 6406.05,10009.14 6406.05,9824.06 6480.69,9749.42 6625.79,9749.42 6651.57,9775.2 C199.2@6651.57,9820.87 6651.57,9853.27 6645.67,9859.17 H9.1@6645.67,9899.61 H10.1@6645.67,9988.19 H11.1@6645.67,10076.77 H12.1@6645.67,10165.35 H13.1@6645.67,10253.94 H14.1@6645.67,10342.52 H15.1@6645.67,10431.1 H16.1@6645.67,10519.68 6645.67,10560.12 6634.81,10570.98 6507.32,10570.98 6475.71,10539.37 v1(6474.41,10539.37) R225.1@6415.35,10539.37
  Bottom Layer w13.78: v1(5938.98,10834.65) 5938.98,10825.59 5961.61,10802.95 D42.16@5980.31,10802.95 ; C162.1@6177.17,9909.45 6177.17,9951.77 6171.26,9957.68 C13.2@6171.26,9988.19 6171.26,10045.28 R217.1@6169.29,10047.24 6210.77,10047.24 v1@6222.44,10058.92 ; v1(6222.44,10059.06) v1@6222.44,10058.92 ; D29.20@6236.22,10099.41 6236.22,10072.7 v1@6222.44,10058.92 ; R233.1@6415.35,10647.64 6460.49,10647.64 6486.86,10674.01 6501.63,10674.01 ; R232.1@6415.35,10923.23 R231.1@6415.35,10854.33 ; v1(6454.72,10814.96) 6454.72,10847.52 6447.91,10854.33 R231.1@6415.35,10854.33 ; v1(6474.41,10539.37) 6508.95,10573.91 6508.95,10666.69 6501.63,10674.01 ; R231.1@6415.35,10854.33 R230.1@6415.35,10785.43 6462.22,10785.43 6501.63,10746.02 6501.63,10674.01
  Bottom Layer w19.68: v1(5824.8,10696.85) v1(5824.8,10771.65)
$1N2750: D29.1 R217.2 | length 127
  Bottom Layer w13.78: D29.1@6015.75,10099.41 6015.75,10067.3 6035.8,10047.24 R217.2@6102.36,10047.24
$1N2795: C291.2 D35.4 R223.2 R616.2 | length 313.4
  Top Layer w19.68: v1(4805.12,11570.87) 4839.08,11536.9 4841.05,11536.9 4866.14,11511.81 R616.2@4866.14,11509.84 4866.14,11507.87 4820.67,11462.4 D35.4@4820.67,11404.72
  Bottom Layer w13.78: v1(4805.12,11570.87) 4809.06,11566.93 R223.2@4846.46,11566.93 C291.2@4905.51,11566.93
$1N2796: C290.2 D35.2 R222.2 R615.2 | length 367.2
  Top Layer w19.68: D35.2@4920.67,11404.72 4920.67,11456.1 R615.2@4974.41,11509.84 4974.41,11511.81 4931.1,11555.12 v1(4931.1,11610.24)
  Bottom Layer w13.78: v1(4931.1,11610.24) 4933.07,11610.24 4974.41,11568.9 R222.2@4974.41,11566.93 C290.2@5033.46,11566.93
$1N2801: D35.6 R6.1 | length 117.2
  Top Layer w19.68: D35.6@4870.67,11189.76 4870.67,11149.33 4875.98,11144.02 R6.1@4875.98,11074.8
$1N2803: C16.2 C106.2 C160.1 C164.1 D32.1 D33.1 FB1.2 R234.1 R235.1 R236.1 R237.1 R238.1 R239.1 R240.1 R241.1 | length 2302.2
  Top Layer w13.78: C160.1@4246.06,11137.8 4250,11137.8 4303.15,11190.94 D33.1@4336.81,11190.94 4336.81,11232.36 4398.38,11293.93 4668.66,11293.93 v1(4718.5,11244.09)
  Top Layer w19.68: R236.1@4374.02,11007.87 4374.02,11005.91 v1@4403.54,10976.38 ; v1(4403.54,10968.5) v1@4403.54,10976.38 ; R235.1@4433.07,11007.87 4433.07,11005.91 v1@4403.54,10976.38 ; R234.1@4610.24,11007.87 4610.24,11005.91 v1@4643.7,10972.44 ; FB1.2@4655.51,10903.54 4655.51,10956.69 v1(4643.7,10968.5) v1@4643.7,10972.44 ; R237.1@4669.29,11007.87 4669.29,11005.91 4643.7,10980.32 v1@4643.7,10972.44 ; v1(5068.9,11090.55) 5072.83,11094.49 C106.2@5072.83,11141.73
  Mid Layer 2 w19.68: v1(4403.54,10968.5) 4403.54,10996.7 4419,11012.16 4628.18,11012.16 4643.7,10996.64 v1(4643.7,10968.5) 4662.55,10987.35 4662.88,10987.35 4718.5,11042.98 v1(4718.5,11244.09)
  Bottom Layer w13.78: R241.1@4374.02,11007.87 4374.02,10977.09 4382.61,10968.5 v1(4403.54,10968.5) 4403.54,10976.38 4406.64,10979.48 4406.64,10981.45 R238.1@4433.07,11007.87 ; R239.1@4610.24,11007.87 4638.75,10979.36 4638.75,10977.39 v1@4643.7,10972.44 ; v1(4643.7,10968.5) v1@4643.7,10972.44 ; R240.1@4669.29,11007.87 4643.7,10982.28 v1@4643.7,10972.44 ; D32.1@4687.01,11190.94 4687.01,11232.36 4698.74,11244.09 v1(4718.5,11244.09)
  Bottom Layer w19.68: v1(4718.5,11244.09) 4750,11275.59 C164.1@4787.4,11275.59 4842.52,11275.59 C16.2@4866.14,11251.97 5000.08,11251.97 5068.9,11183.15 v1(5068.9,11090.55)
$1N2805: D29.2 D42.15 | length 803
  Bottom Layer w13.78: D42.15@5980.31,10752.95 5999.02,10752.95 6129.72,10622.25 6129.72,10448.7 6166.07,10412.34 6166.07,10232.92 6058.15,10125 D29.2@6015.75,10125
$1N2806: D29.3 D42.14 | length 703.6
  Bottom Layer w10: D42.14@5980.31,10702.95 5999.02,10702.95 6101.58,10600.39 6101.58,10436.92 6143.94,10394.56 6143.94,10245.6 6048.93,10150.59 D29.3@6015.75,10150.59
$1N2807: D29.4 D42.13 | length 616.7
  Bottom Layer w10: D42.13@5980.31,10652.95 5999.02,10652.95 6080.66,10571.3 6080.66,10435.34 6128.03,10387.97 6128.03,10252.19 6052.02,10176.18 D29.4@6015.75,10176.18
$1N2808: D29.5 D42.12 | length 529.7
  Bottom Layer w10: D42.12@5980.31,10602.95 5999.02,10602.95 6064.03,10537.94 6064.03,10429.48 6112.13,10381.39 6112.13,10258.78 6055.12,10201.77 D29.5@6015.75,10201.77
$1N2809: D29.6 D42.11 | length 442.8
  Bottom Layer w10: D42.11@5980.31,10552.95 5999.02,10552.95 6047.87,10504.1 6047.87,10423.15 6096.22,10374.8 6096.22,10265.37 6077.59,10246.73 6077.52,10246.73 6058.15,10227.36 D29.6@6015.75,10227.36
$1N2810: D29.7 D42.10 | length 355.8
  Bottom Layer w10: D42.10@5980.31,10502.95 5999.02,10502.95 6029.33,10472.64 6029.33,10419.2 6080.31,10368.21 6080.31,10271.95 6071,10262.64 6070.93,10262.64 6061.25,10252.95 D29.7@6015.75,10252.95
$1N2811: D29.8 D42.9 | length 253.8
  Bottom Layer w10: D42.9@5980.31,10452.95 5980.31,10436.89 6064.41,10352.8 6064.41,10285.61 6057.34,10278.54 D29.8@6015.75,10278.54
$1N2812: D29.9 D42.7 | length 525.3
  Mid Layer 1 w10: v1(5962.6,10303.15) 6133.26,10303.15 6246.06,10415.95 v1(6246.06,10503.94)
  Bottom Layer w13.78: v1(5962.6,10303.15) 5963.58,10304.13 D29.9@6015.75,10304.13 ; D42.7@6192.91,10502.95 6245.08,10502.95 v1(6246.06,10503.94)
$1N2889: D42.1 D74.2 R232.2 | length 610.6
  Top Layer w13.78: v1(6135.83,10803.15) 6135.83,10518.62 6151.5,10502.95 D74.2@6192.91,10502.95
  Bottom Layer w13.78: v1(6135.83,10803.15) 6136.02,10802.95 D42.1@6192.91,10802.95 6211.61,10802.95 6306.8,10898.14 6323.34,10898.14 R232.2@6348.43,10923.23
$1N2890: D42.2 D74.7 R231.2 | length 268.4
  Top Layer w13.78: D74.7@6192.91,10752.95 6241.14,10752.95 v1(6244.09,10755.91)
  Bottom Layer w13.78: D42.2@6192.91,10752.95 6241.14,10752.95 v1(6244.09,10755.91) 6244.09,10787.46 6285.88,10829.24 6323.34,10829.24 R231.2@6348.43,10854.33
$1N2891: D42.3 D74.10 R230.2 | length 440.3
  Top Layer w13.78: D74.10@5980.31,10752.95 6021.73,10752.95 6037.4,10768.62 v1(6037.4,10771.65)
  Bottom Layer w13.78: v1(6037.4,10771.65) 6106.1,10702.95 D42.3@6192.91,10702.95 6263.98,10702.95 6346.46,10785.43 R230.2@6348.43,10785.43
$1N2892: D74.13 R224.2 | length 92.6
  Top Layer w13.78: R224.2@5893.7,10588.58 5939.25,10588.58 5953.62,10602.95 D74.13@5980.31,10602.95
$1N2898: C104.2 D74.1 R225.2 | length 333
  Top Layer w10: R225.2@6348.43,10539.37 R225.2@6354.33,10545.28
  Top Layer w13.78: D74.1@6192.91,10452.95 6211.61,10452.95 6239.22,10425.34 6315.47,10425.34 6348.43,10458.3 R225.2@6348.43,10539.37 ; R225.2@6354.33,10545.28 C104.2@6354.33,10608.27
$1N2903: D32.9 D32.15 D33.9 D33.15 | length 585.5
  Top Layer w13.78: v1(4364.17,11452.76) 4368.26,11448.67 4368.26,11440.8 4386.81,11422.24 D33.15@4386.81,11403.54 4386.81,11357.38 4414.54,11329.65 4615.08,11329.65 v1(4635.83,11350.39) 4675.28,11350.39 4687.01,11362.13 D33.9@4687.01,11403.54
  Bottom Layer w13.78: D32.9@4336.81,11403.54 4336.81,11422.24 4355.36,11440.8 4355.36,11443.95 v1(4364.17,11452.76) ; v1(4635.83,11350.39) 4637.01,11351.57 D32.15@4637.01,11403.54
$1N2933: H9.2 R132.2 | length 201.4
  Top Layer w19.68: v1(6517.72,9901.57) 6519.69,9899.61 H9.2@6570.87,9899.61
  Bottom Layer w13.78: R132.2@6444.88,10017.72 6446.85,10017.72 6517.72,9946.85 v1(6517.72,9901.57)
$1N2934: H10.2 R133.2 | length 173.1
  Top Layer w19.68: v1(6517.72,9988.19) H10.2@6570.87,9988.19
  Bottom Layer w13.78: R133.2@6444.88,10076.77 6446.85,10076.77 6500.26,10023.36 6500.26,10005.64 v1(6517.72,9988.19)
$1N2935: H11.2 R134.2 | length 152.1
  Top Layer w19.68: v1(6517.72,10074.8) 6519.69,10076.77 H11.2@6570.87,10076.77
  Bottom Layer w13.78: R134.2@6444.88,10135.83 6446.85,10135.83 6507.87,10074.8 v1(6517.72,10074.8)
$1N2936: H12.2 R135.2 | length 138.2
  Top Layer w19.68: v1(6517.72,10173.23) 6525.59,10165.35 H12.2@6570.87,10165.35
  Bottom Layer w13.78: R135.2@6444.88,10194.88 6496.06,10194.88 v1(6517.72,10173.23)
$1N2937: H13.2 R136.2 | length 127.6
  Top Layer w19.68: v1(6517.72,10255.91) 6519.69,10253.94 H13.2@6570.87,10253.94
  Bottom Layer w13.78: R136.2@6444.88,10253.94 6491.06,10253.94 6493.03,10255.91 v1(6517.72,10255.91)
$1N2938: H14.2 R137.2 | length 138.2
  Top Layer w19.68: v1(6517.72,10342.52) H14.2@6570.87,10342.52
  Bottom Layer w13.78: R137.2@6444.88,10312.99 6446.85,10312.99 6476.38,10342.52 v1(6517.72,10342.52)
$1N2939: H15.2 R138.2 | length 152.1
  Top Layer w19.68: v1(6517.72,10433.07) 6519.69,10431.1 H15.2@6570.87,10431.1
  Bottom Layer w13.78: R138.2@6444.88,10372.05 6469.97,10397.14 6481.78,10397.14 v1(6517.72,10433.07)
$1N2940: H16.2 R139.2 | length 173.1
  Top Layer w19.68: v1(6517.72,10519.68) H16.2@6570.87,10519.68
  Bottom Layer w13.78: R139.2@6444.88,10431.1 6446.85,10431.1 6500.26,10484.51 6500.26,10502.23 v1(6517.72,10519.68)
$1N2966: D42.6 R233.2 R519.2 | length 235.1
  Bottom Layer w13.78: D42.6@6192.91,10552.95 6320.67,10552.95 6346.46,10578.74 R519.2@6348.43,10578.74 R233.2@6348.43,10647.64
$1N2969: D29.19 R5.1 | length 128.3
  Bottom Layer w13.78: D29.19@6236.22,10125 6265.11,10125 6303.15,10086.96 R5.1@6303.15,10041.34
$1N2972: D42.4 D42.5 R7.1 | length 252.6
  Bottom Layer w13.78: D42.4@6192.91,10652.95 D42.5@6192.91,10602.95 6211.61,10602.95 6234.44,10625.78 6255.7,10625.78 6346.46,10716.54 R7.1@6348.43,10716.54
$1N2981: D37.16 D74.4 J1.1 R228.2 | length 1031.6
  Top Layer w13.78: D74.4@6192.91,10602.95 6238.14,10602.95 6289.28,10654.09 6289.28,10696.76 R228.2@6348.43,10755.91 6348.43,10808.07 6291.14,10865.36 D37.16@6291.14,10917.32
  Top Layer w19.68: D37.16@6291.14,10917.32 6322.78,10917.32 6416.48,11011.03 6416.48,11124.58 6519.85,11227.95 6612.18,11227.95 6629.53,11245.3 J1.1@6629.53,11307.09
$1N2982: D37.14 D74.5 J2.1 R227.2 | length 1445.9
  Top Layer w13.78: D37.14@6191.14,10917.32 6191.14,10876.89 6200.12,10867.91 6246.04,10867.91 6284.72,10829.23 6284.72,10740.14 6250,10705.43 v1(6250,10665.35) 6237.6,10652.95 D74.5@6192.91,10652.95 ; v1(6289.37,10598.43) 6304.86,10613.92 6304.86,10633.6 R227.2@6348.43,10677.17
  Top Layer w19.68: D37.14@6191.14,10917.32 6191.14,10980.34 6221.11,11010.31 6285.9,11010.31 6382.32,11106.73 6382.32,11175.89 6476.98,11270.55 6476.98,11340.71 6629.53,11493.26 J2.1@6629.53,11562.99
  Mid Layer 2 w19.68: v1(6250,10665.35) 6250,10637.8 v1(6289.37,10598.43)
$1N2983: D37.12 D74.12 J3.1 R226.2 | length 1710.4
  Top Layer w13.78: R226.2@5893.7,10657.48 5930.31,10657.48 5934.84,10652.95 D74.12@5980.31,10652.95 6048.23,10652.95 6099.74,10704.46 6099.74,10863.41 6091.14,10872 D37.12@6091.14,10917.32
  Top Layer w19.68: D37.12@6091.14,10917.32 6091.14,10987.13 6159.83,11055.82 6274.84,11055.82 6351.05,11132.02 6351.05,11585.02 6478.78,11712.75 6619.78,11712.75 6629.53,11722.49 J3.1@6629.53,11809.06
$1N2985: C287.2 D37.4 R219.2 R612.2 | length 380.9
  Top Layer w19.68: D37.4@6141.14,11165.35 6141.14,11217.91 6194.88,11271.65 R612.2@6194.88,11273.62 6194.88,11275.59 6143.7,11326.77 v1(6143.7,11381.89)
  Bottom Layer w10: v1(6143.7,11381.89) v1@6145.67,11379.92
  Bottom Layer w13.78: v1@6145.67,11379.92 C287.2@6145.67,11330.71 R219.2@6214.57,11330.71
$1N2993: C289.2 D37.8 R221.2 R614.2 | length 377.2
  Top Layer w19.68: D37.8@5941.14,11165.35 5941.14,11214.76 5998.03,11271.65 R614.2@5998.03,11273.62 5998.03,11275.59 5950.79,11322.83 v1(5950.79,11381.89)
  Bottom Layer w13.78: C289.2@5909.45,11330.71 R221.2@5968.5,11330.71 5968.5,11364.17 v1(5950.79,11381.89)
$1N3000: C286.2 D37.2 R218.2 R611.2 | length 385.9
  Top Layer w19.68: v1(6238.19,11381.89) 6238.19,11330.71 6293.31,11275.59 R611.2@6293.31,11273.62 6293.31,11271.65 6241.14,11219.49 D37.2@6241.14,11165.35
  Bottom Layer w13.78: v1(6238.19,11381.89) 6238.19,11368.11 6273.62,11332.68 C286.2@6273.62,11330.71 R218.2@6332.68,11330.71
$1N3002: C288.2 D37.6 R220.2 R613.2 | length 378.2
  Top Layer w19.68: D37.6@6041.14,11165.35 6041.14,11216.34 6096.46,11271.65 R613.2@6096.46,11273.62 6096.46,11275.59 6049.21,11322.83 v1(6049.21,11381.89)
  Bottom Layer w13.78: v1(6049.21,11381.89) 6027.56,11360.24 C288.2@6027.56,11330.71 R220.2@6086.61,11330.71
$1N4694: D31.4 D74.9 | length 243.8
  Top Layer w13.78: D31.4@5775.59,10708.66 5785.43,10708.66 5807.52,10730.74 5855.69,10730.74 5927.89,10802.95 D74.9@5980.31,10802.95
$1N4724: D37.10 R10.1 | length 347.9
  Top Layer w13.78: R10.1@5755.91,10903.54 5757.87,10903.54 5861.42,11007.09 5957,11007.09 5991.14,10972.95 D37.10@5991.14,10917.32
$1N4736: D35.8 R11.1 | length 116.5
  Top Layer w19.68: D35.8@4970.67,11189.76 4970.67,11149.33 4974.41,11145.59 R11.1@4974.41,11074.8
$1N5276: D33.14 R8.2 | length 98
  Top Layer w13.78: R8.2@4433.07,11500 4433.07,11467.44 4436.81,11463.7 D33.14@4436.81,11403.54
$1N5278: D33.13 R9.2 | length 98.7
  Top Layer w13.78: D33.13@4486.81,11403.54 4486.81,11462.13 4492.13,11467.44 R9.2@4492.13,11500
$1N5280: D33.3 R12.1 R236.2 | length 201.2
  Top Layer w13.78: R12.1@4314.96,11074.8 R236.2@4374.02,11074.8 4399.11,11099.89 4399.11,11108.17 4436.81,11145.88 D33.3@4436.81,11190.94
$1N5282: D33.4 R13.1 R235.2 | length 177.4
  Top Layer w13.78: R235.2@4433.07,11074.8 R13.1@4492.13,11074.8 4492.13,11144.21 4486.81,11149.53 D33.4@4486.81,11190.94
$1N5284: D32.2 D32.8 D33.2 D33.8 | length 950.4
  Top Layer w13.78: v1(4360.24,11141.73) 4373.14,11141.73 4386.81,11155.41 D33.2@4386.81,11190.94 4386.81,11245.84 4408.17,11267.21 4628.18,11267.21 4686.81,11208.58 D33.8@4686.81,11190.94
  Bottom Layer w13.78: v1(4360.24,11141.73) 4344.8,11141.73 4337.01,11149.53 D32.8@4337.01,11190.94 4337.01,11240.12 4351.47,11254.58 4620.48,11254.58 4637.01,11238.05 D32.2@4637.01,11190.94
$1N5324: D33.5 R14.1 R234.2 | length 181.1
  Top Layer w13.78: D33.5@4536.81,11190.94 4536.81,11121.73 4551.18,11107.36 R14.1@4551.18,11074.8 R234.2@4610.24,11074.8
$1N5325: D33.6 R15.1 R237.2 | length 209.4
  Top Layer w13.78: D33.6@4586.81,11190.94 4586.81,11172.24 4604.03,11155.03 4604.03,11142.04 4669.29,11076.77 R237.2@4669.29,11074.8 R15.1@4728.35,11074.8
$1N5348: D32.3 R16.1 R240.2 | length 209.3
  Bottom Layer w13.78: D32.3@4587.01,11190.94 4587.01,11175.05 4642.86,11119.19 4642.86,11101.23 R240.2@4669.29,11074.8 R16.1@4728.35,11074.8
$1N5349: D32.4 R17.1 R239.2 | length 181.1
  Bottom Layer w13.78: D32.4@4537.01,11190.94 4537.01,11135.53 4551.18,11121.36 R17.1@4551.18,11074.8 R239.2@4610.24,11074.8
$1N5356: D32.5 R18.1 R238.2 | length 177.3
  Bottom Layer w13.78: R238.2@4433.07,11074.8 R18.1@4492.13,11074.8 4492.13,11125.89 4487.01,11131 D32.5@4487.01,11190.94
$1N5357: D32.6 R19.1 R241.2 | length 201.3
  Bottom Layer w13.78: R19.1@4314.96,11074.8 R241.2@4374.02,11074.8 4374.02,11076.77 4437.01,11139.76 D32.6@4437.01,11190.94
$1N5396: D33.12 R20.2 | length 102.4
  Top Layer w13.78: D33.12@4536.81,11403.54 4536.81,11453.07 4551.18,11467.44 R20.2@4551.18,11500
$1N5397: D33.11 R21.2 | length 106.2
  Top Layer w13.78: D33.11@4586.81,11403.54 4586.81,11422.24 4610.24,11445.67 R21.2@4610.24,11500
$1N5420: D32.14 R22.2 | length 125.2
  Bottom Layer w13.78: R22.2@4541.34,11509.84 4541.34,11507.87 4587.01,11462.2 D32.14@4587.01,11403.54
$1N5421: D32.13 R23.2 | length 129
  Bottom Layer w13.78: R23.2@4482.28,11509.84 4482.28,11507.87 4537.01,11453.15 D32.13@4537.01,11403.54
$1N5428: D32.12 R24.2 | length 133.2
  Bottom Layer w13.78: R24.2@4423.23,11509.84 4423.23,11507.87 4448.32,11482.78 4449.18,11482.78 4487.01,11444.96 D32.12@4487.01,11403.54
$1N5429: D32.11 R25.2 | length 136.5
  Bottom Layer w13.78: R25.2@4364.17,11509.84 4364.17,11507.87 4419.79,11452.26 4419.79,11439.46 4437.01,11422.24 D32.11@4437.01,11403.54
$1N6031: R542.1 X17.19 | length 129.7
  Bottom Layer w19.68: R542.1@5122.05,12277.56 5203.35,12277.56 5207.68,12273.23 X17.19@5250,12273.23
$1N6122: C219.1 R437.1 TP35.1 | length 1404.3
  Bottom Layer w13.78: C219.1@5372.05,12350.39 5403.26,12381.6 5602.71,12381.6 5618.11,12366.21 R437.1@5618.11,12340.55 6213.5,12340.55 6293.84,12260.21 6293.84,12165.05 6423.02,12035.87 6488.66,12035.87 6489.09,12035.43 TP35.1@6549.21,12035.43
$1N6267: R543.1 X18.19 | length 206.2
  Bottom Layer w19.68: X18.19@4762.2,12173.23 4829.63,12240.66 4866.64,12240.66 4903.54,12277.56 R543.1@4925.2,12277.56
$1N6269: R33.2 X18.14 | length 239.5
  Bottom Layer w13.78: X18.14@4462.2,12273.23 4512.2,12223.23 4512.2,12139.37 4570.87,12080.71 R33.2@4570.87,12078.74
$1N6279: R620.1 X18.16 | length 252.8
  Bottom Layer w13.78: X18.16@4562.2,12273.23 4604.88,12230.55 4604.88,12169.71 4668.79,12105.8 4671.76,12105.8 R620.1@4698.82,12078.74
$1N6283: R618.1 X18.17 | length 134.8
  Bottom Layer w13.78: X18.17@4662.2,12173.23 4692.13,12143.3 4693.31,12143.3 R618.1@4757.87,12078.74
$1N6287: R619.1 X18.18 | length 272.3
  Bottom Layer w13.78: X18.18@4662.2,12273.23 4712.2,12223.23 4712.2,12160.1 4750.25,12122.05 4773.62,12122.05 R619.1@4816.93,12078.74
$1N6293: R447.2 X18.13 | length 202.2
  Bottom Layer w13.78: R447.2@4377.95,12340.55 4416.81,12301.69 4416.81,12218.62 X18.13@4462.2,12173.23
$1N6304: C220.1 R447.1 TP36.1 | length 1058.4
  Bottom Layer w13.78: R447.1@4311.02,12340.55 4311.02,12372.96 4320.77,12382.71 4448.92,12382.71 4458.66,12372.96 C220.1@4458.66,12340.55
  Bottom Layer w19.68: TP36.1@3566.93,12114.17 3793.31,12340.55 R447.1@4311.02,12340.55
$1N6661: R617.1 X17.17 | length 346.7
  Top Layer w13.78: v1(5316.93,12000) 5316.93,12024.68 5298.97,12042.64 5298.97,12222.2 X17.17@5350,12273.23
  Bottom Layer w13.78: R617.1@5273.62,11996.06 5312.99,11996.06 v1(5316.93,12000)
$1N6663: R437.2 X17.13 | length 67.8
  Bottom Layer w13.78: X17.13@5550,12273.23 5550,12316.14 5551.18,12317.32 R437.2@5551.18,12340.55
$1N6671: R29.1 X17.15 | length 217.5
  Bottom Layer w13.78: R29.1@5446.85,12098.43 5471.94,12123.52 5471.94,12131.11 5499.91,12159.08 5499.91,12223.32 X17.15@5450,12273.23
$1N6672: R435.2 X17.2 | length 101.5
  Bottom Layer w13.78: X17.2@6150,12173.23 6189.48,12133.75 6189.48,12123.52 R435.2@6214.57,12098.43
$1N6673: R434.2 X17.4 | length 94
  Bottom Layer w13.78: X17.4@6050,12173.23 6096.46,12126.77 R434.2@6096.46,12098.43
$1N6674: R433.2 X17.8 | length 79
  Bottom Layer w13.78: X17.8@5850,12173.23 5860.24,12162.99 R433.2@5860.24,12098.43
$1N6675: R432.2 X17.6 | length 86.5
  Bottom Layer w13.78: X17.6@5950,12173.23 5978.35,12144.88 R432.2@5978.35,12098.43
$1N6677: R436.2 X17.5 | length 203.5
  Bottom Layer w13.78: R436.2@5919.29,12098.43 5919.29,12130.98 5900.02,12150.25 5900.02,12223.25 X17.5@5950,12273.23
$1N6678: R431.2 X17.3 | length 211.3
  Bottom Layer w13.78: R431.2@6037.4,12098.43 5999.68,12136.15 5999.68,12222.9 X17.3@6050,12273.23
$1N6679: R430.2 X17.1 | length 216.1
  Bottom Layer w13.78: X17.1@6150,12273.23 6102.91,12226.14 6102.91,12151.03 R430.2@6155.51,12098.43
$1N6680: R429.2 X17.7 | length 195
  Bottom Layer w13.78: R429.2@5801.18,12098.43 5801.18,12224.41 X17.7@5850,12273.23
$1N6681: R428.2 X17.9 | length 202.5
  Bottom Layer w13.78: R428.2@5683.07,12098.43 5683.07,12133.13 5702.6,12152.67 5702.6,12225.83 X17.9@5750,12273.23
$1N6682: R31.1 X17.14 | length 93.1
  Bottom Layer w13.78: R31.1@5505.91,12098.43 5505.91,12129.13 X17.14@5550,12173.23
$1N6683: R30.2 X17.16 | length 100.6
  Bottom Layer w13.78: R30.2@5387.8,12098.43 5387.8,12100.39 5421.41,12134.01 5421.41,12144.64 X17.16@5450,12173.23
$1N6684: R32.2 X17.18 | length 95.2
  Bottom Layer w13.78: R32.2@5312.99,12094.49 5314.96,12094.49 5350,12129.53 X17.18@5350,12173.23
$1N6685: R27.1 X17.11 | length 210
  Bottom Layer w13.78: R27.1@5564.96,12098.43 5598.37,12131.83 5598.37,12221.6 X17.11@5650,12273.23
$1N6686: R28.2 X17.12 | length 85.6
  Bottom Layer w13.78: R28.2@5624.02,12098.43 5624.02,12100.39 5650,12126.38 X17.12@5650,12173.23
$1N6687: R26.2 X17.10 | length 78.1
  Bottom Layer w13.78: R26.2@5742.13,12098.43 5742.13,12130.98 5750,12138.86 X17.10@5750,12173.23
$1N6723: R450.2 X18.2 | length 218.9
  Bottom Layer w13.78: X18.2@3862.2,12273.23 3912.69,12222.74 3912.69,12119.87 3921.26,12111.3 R450.2@3921.26,12078.74
$1N6724: R449.2 X18.1 | length 94.5
  Bottom Layer w13.78: R449.2@3862.2,12078.74 X18.1@3862.2,12173.23
$1N6726: R448.2 X18.3 | length 112.6
  Bottom Layer w13.78: X18.3@3962.2,12173.23 3962.2,12078.74 R448.2@3980.32,12078.74
$1N6727: R444.2 X18.9 | length 124.5
  Bottom Layer w13.78: X18.9@4262.2,12173.23 4308.22,12127.21 4308.22,12105.17 R444.2@4334.65,12078.74
$1N6728: R441.2 X18.5 | length 109.5
  Bottom Layer w13.78: X18.5@4062.2,12173.23 4062.2,12132.8 4073.34,12121.67 4073.34,12103.83 R441.2@4098.43,12078.74
$1N6729: R439.2 X18.7 | length 117
  Bottom Layer w13.78: X18.7@4162.2,12173.23 4162.2,12135.04 4216.54,12080.71 R439.2@4216.54,12078.74
$1N6730: R438.2 X18.11 | length 132
  Bottom Layer w13.78: X18.11@4362.2,12173.23 4392.13,12143.3 4392.13,12141.33 4426.33,12107.14 4426.33,12105.17 R438.2@4452.76,12078.74
$1N6731: R446.2 X18.4 | length 226.5
  Bottom Layer w13.78: X18.4@3962.2,12273.23 4014.28,12221.15 4014.28,12105.8 4039.37,12080.71 R446.2@4039.37,12078.74
$1N6732: R445.2 X18.6 | length 234
  Bottom Layer w13.78: X18.6@4062.2,12273.23 4116.93,12218.5 4116.93,12121.26 4157.48,12080.71 R445.2@4157.48,12078.74
$1N6733: R443.2 X18.8 | length 241.5
  Bottom Layer w13.78: X18.8@4162.2,12273.23 4212.2,12223.23 4212.2,12142.13 R443.2@4275.59,12078.74
$1N6734: R442.2 X18.12 | length 270.1
  Bottom Layer w13.78: X18.12@4362.2,12273.23 4379.97,12255.46 4379.97,12220.98 4412.2,12188.74 4412.2,12155.11 4445.27,12122.05 4468.5,12122.05 R442.2@4511.81,12078.74
$1N6735: R440.2 X18.10 | length 249
  Bottom Layer w13.78: X18.10@4262.2,12273.23 4312.2,12223.23 4312.2,12162.2 4393.7,12080.71 R440.2@4393.7,12078.74
$1N6736: R34.1 X18.15 | length 126.6
  Bottom Layer w13.78: X18.15@4562.2,12173.23 4590.8,12144.64 4590.8,12129.68 4639.76,12080.71 R34.1@4639.76,12078.74
$1N6777: OSC1.1 R519.1 | length 91
  Bottom Layer w19.68: R519.1@6415.35,10578.74 6415.35,10534.45 6421.26,10528.54 OSC1.1@6421.26,10490.16
$2N2328: D38.7 R591.2 | length 626.9
  Top Layer w13.78: R591.2@1805.12,6814.96 1805.12,7088.32 1867.38,7150.59 D38.7@2132.87,7150.59
$2N2329: D38.9 R411.2 | length 446.8
  Top Layer w13.78: R411.2@1913.39,6814.96 1985.72,6887.29 1985.72,7074.23 2010.9,7099.41 D38.9@2132.87,7099.41
$2N2330: D38.10 R415.2 | length 361
  Top Layer w13.78: R415.2@2021.65,6814.96 2021.65,7058.3 2037.17,7073.82 D38.10@2132.87,7073.82
$2N2331: C283.2 R411.1 R415.1 R591.1 V2.1 V53.1 | length 1022.5
  Top Layer w29.53: R591.1@1805.12,6704.72 1805.12,6668.24 1852.76,6620.61 V2.1@1852.76,6509.84 ; R411.1@1913.39,6704.72 1913.39,6570.47 V2.1@1852.76,6509.84 ; R415.1@2021.65,6704.72 2021.65,6598.36 1933.14,6509.84 V2.1@1852.76,6509.84
  Bottom Layer w19.68: V53.1@1834.65,6621.06 1834.65,6592.44 1852.76,6574.33 V2.1@1852.76,6509.84 1933.07,6590.16 C283.2@1933.07,6633.86
$2N2332: D38.21 R414.2 | length 687.2
  Top Layer w13.78: D38.21@2382.87,7227.36 2589.56,7227.36 2631.8,7185.12 2631.8,7067.31 2632.26,7066.86 2632.26,6959.72 2730.32,6861.66 R414.2@2730.32,6805.12
$2N2333: D38.18 R590.2 | length 437.1
  Top Layer w13.78: D38.18@2382.87,7150.59 2446.73,7150.59 2468.14,7129.18 2468.14,6900.2 2513.78,6854.56 R590.2@2513.78,6805.12
$2N2334: D38.20 R410.2 | length 607.7
  Top Layer w13.78: D38.20@2382.87,7201.77 2574.02,7201.77 2599.55,7176.24 2599.55,6871.91 2622.05,6849.41 R410.2@2622.05,6805.12